# Altium PCB Urukul.PcbDoc (part 9 of 15)
Units mm, origin at the board's own origin, x right, y up, seen from the top; angles counter-clockwise.
Board outline 161.99 x 100 mm, 6 copper layers (L1, L2, L3, L4, P5, L6), stack 1.548 mm thick; 1078 components, 609 nets, 3798 pads, 2552 vias.
Unrouted connection lines stored in the file: 1.
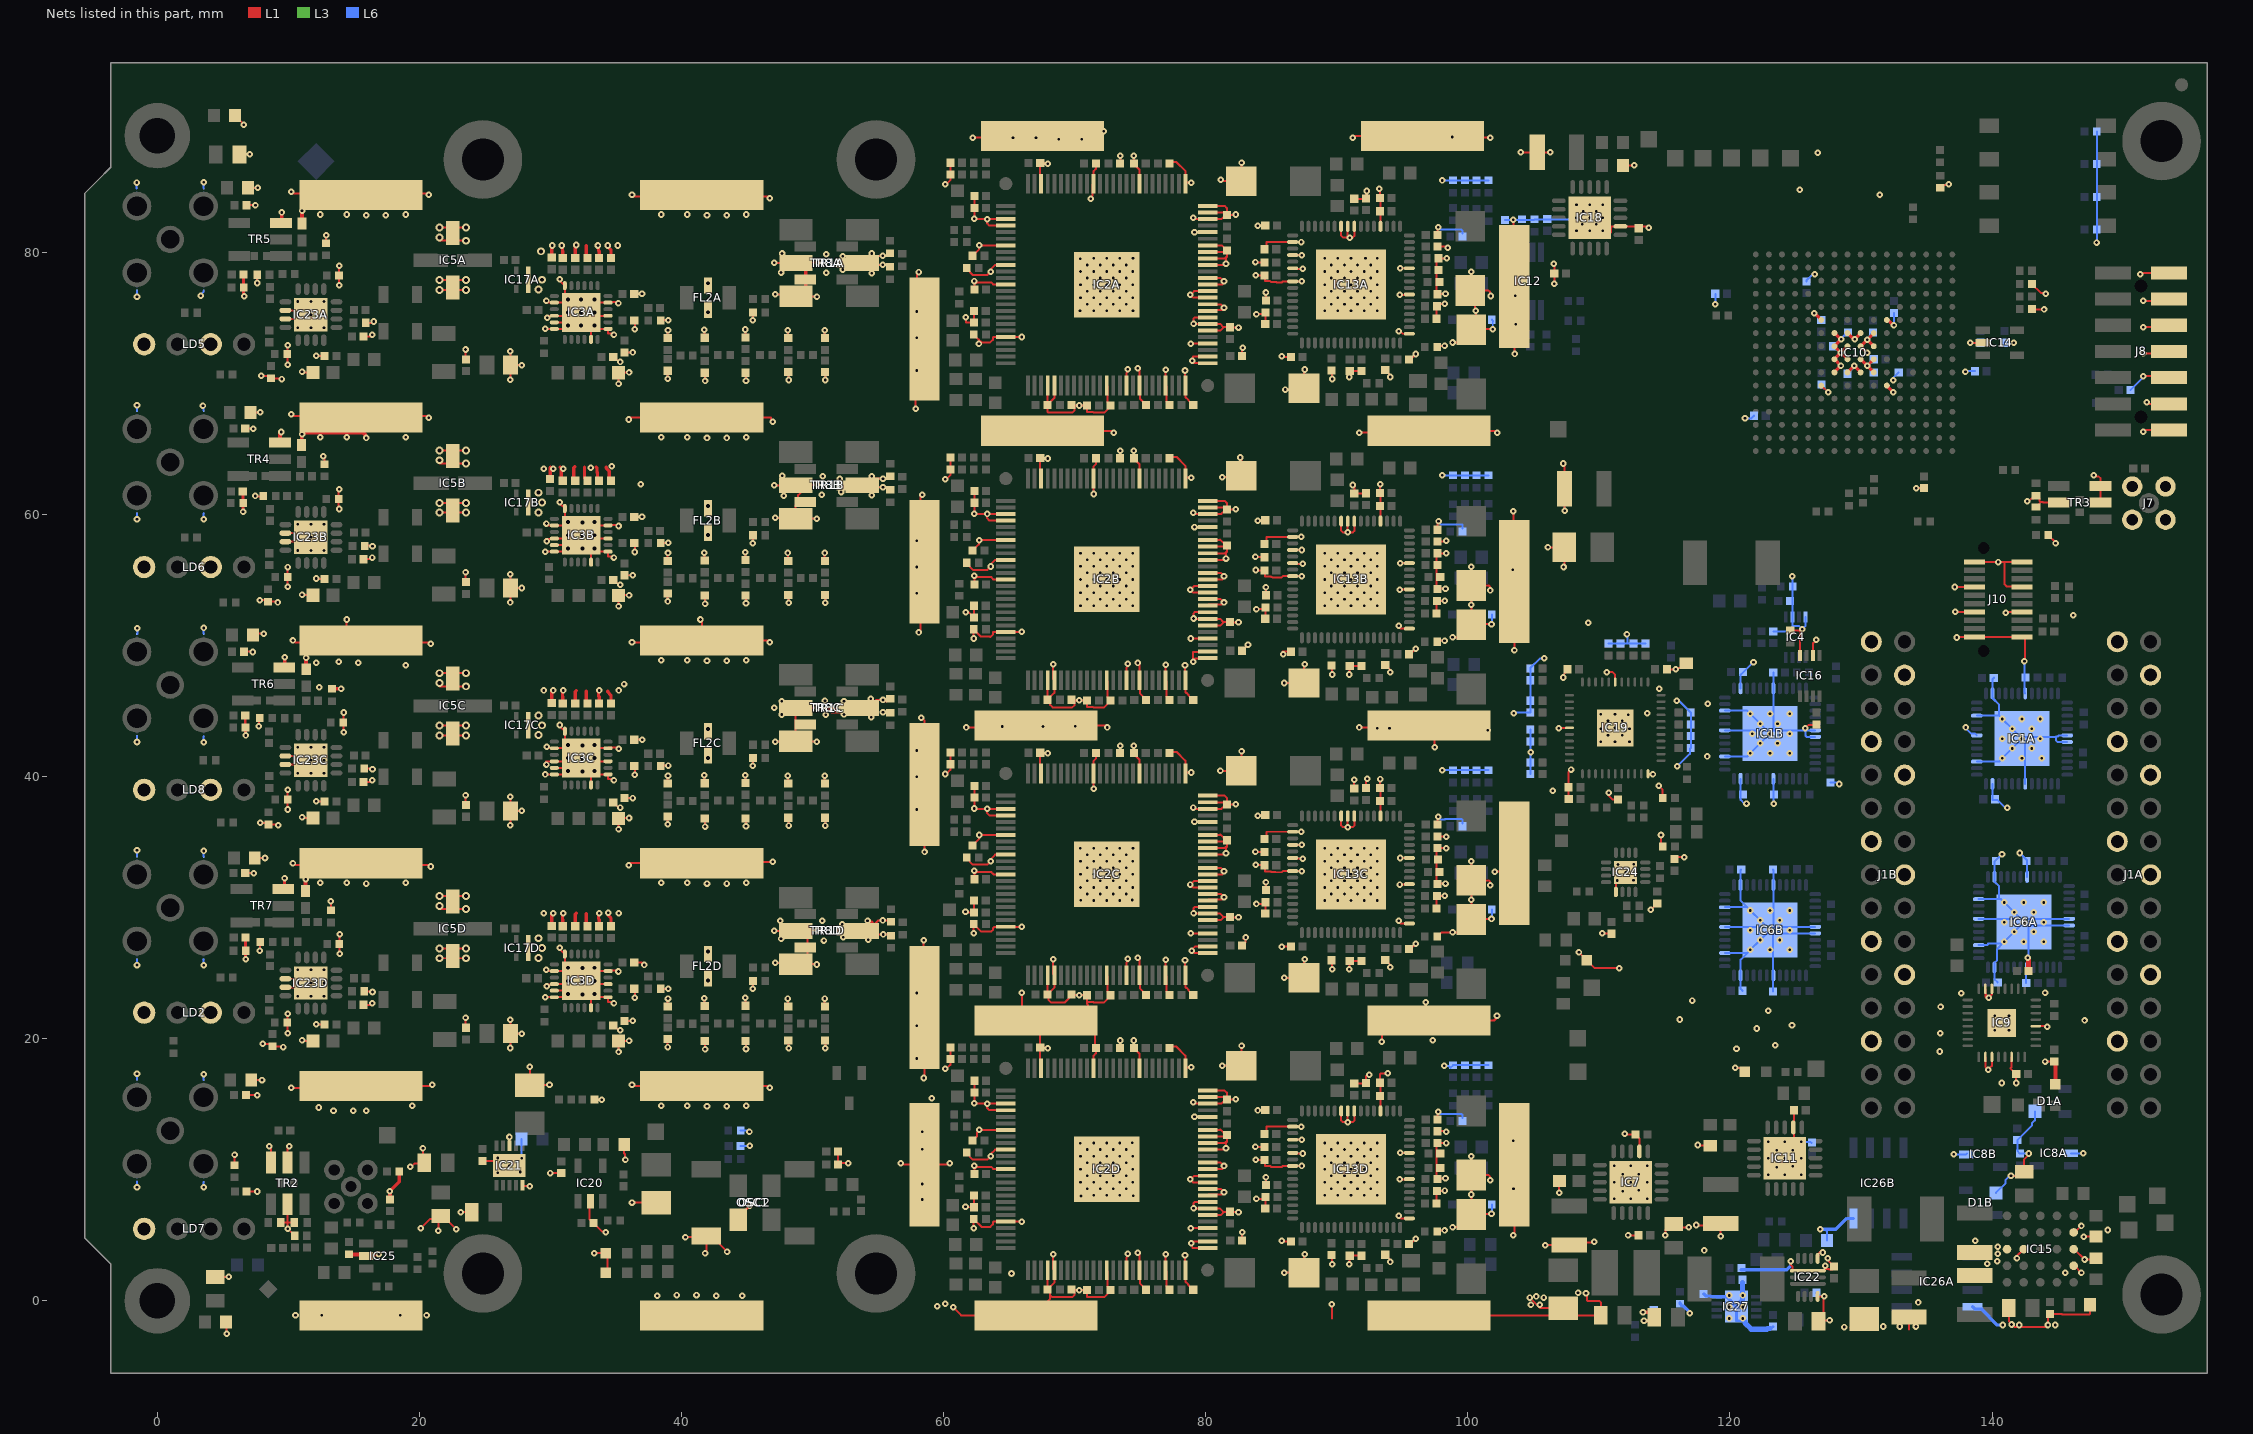
[diagram p11: the nets of this part, all layers, seen from the top]

## Via types
v1: diameter 0.5, hole 0.2, L1 to L6, tented both sides, 1964 vias
v2: diameter 0.5, hole 0.2, L1 to L6, 480 vias
v3: diameter 0.6, hole 0.3, L1 to L6, tented both sides, 52 vias
v4: diameter 0.6, hole 0.3, L1 to L6, 36 vias
v5: diameter 0.762, hole 0.508, L1 to L6, tented both sides, 20 vias

## Nets (pads, with @x,y where several pads share a name; then routed paths per layer and width w, separated by ;. In a path a pad name is that pad's centre, name@x,y a point inside that pad or via, vN(x,y) a via of type N, cw(c..) or ccw(c..) an arc to the next point about the centre after c; other vN are vias at no path point) (continued)
GND: (continued)
  L1 w0.152: C121.2@4.423,1.809 5.45,1.809 v1(5.464,1.823) ; R161.1@5.248,-1.606 5.294,-1.651 v1(5.294,-2.52) ; R6.1@5.894,10.358 v1(5.894,11.138) ; R159.1@5.934,90.444 6.607,89.771 v1(6.607,89.733) ; C113.2@6.263,87.472 6.288,87.498 v1(7.064,87.498) ; C34.1@6.608,49.53 7.275,49.53 7.301,49.505 v1(7.275,49.505) ; C35.2@6.708,32.639 7.325,32.639 v1(7.35,32.614) ; v1@6.708,43.187 v1(6.756,43.138) 6.756,43.71 R74.1@6.728,43.739 ; C31.2@6.708,66.573 7.299,66.573 v1(7.325,66.548) ; R75.1@6.753,26.711 6.759,26.706 v1@6.759,26.138 ; C37.2@6.759,15.697 7.604,15.697 v1(7.629,15.672) ; C11.2@6.796,83.596 v1(7.489,83.596) ; C42.1@6.814,8.338 v1(7.614,8.338) ; R156.1@6.926,84.931 v1(7.65,84.931) v1@7.67,84.931 ; R157.1@7.121,67.787 v1(7.845,67.787) ; R14.1@7.183,16.846 v1(7.987,16.846) ; R158.1@7.291,50.795 7.398,50.902 v1(8.117,50.902) ; R160.1@7.442,33.802 8.203,33.802 v1(8.217,33.788) ; v1(7.463,61.413) 7.488,61.388 8.059,61.388 R3B.1@8.085,61.413 ; v1@7.624,77.753 v1(7.624,77.663) R3A.1@7.624,78.317 ; v1(7.746,43.839) 7.746,44.384 R3C.1@7.819,44.456 ; v1@7.772,16.835 v1@7.783,16.846 ; v1(7.819,26.711) 7.819,27.345 R3D.1@7.855,27.381 ; v1(7.826,53.463) 8.431,53.463 R18B.1@8.451,53.483 ; v1(7.846,36.463) 8.451,36.463 R18C.1@8.471,36.483 ; v1(7.924,70.583) 8.654,70.583 8.729,70.508 R18A.1@8.749,70.528 ; v1(8.035,19.613) 8.765,19.613 8.84,19.538 R18D.1@8.86,19.558 ; R18B.1@8.451,53.343 9.146,53.343 v1(9.201,53.288) ; R18C.1@8.471,36.343 9.166,36.343 v1(9.221,36.288) ; v1(8.555,11.785) 8.674,11.665 TR2.1@8.674,10.553 ; R18A.1@8.749,70.388 9.444,70.388 v1(9.499,70.333) ; R18D.1@8.86,19.418 9.555,19.418 v1(9.61,19.363) ; C69.1@9.434,5.963 9.944,5.963 ; IC23D.11@9.773,23.924 11.398,23.924 v2(11.723,24.249) 11.398,24.574 IC23D.10@9.773,24.574 ; IC23C.11@9.773,40.924 11.398,40.924 v2(11.723,41.249) 11.398,41.574 IC23C.10@9.773,41.574 ; IC23B.11@9.773,57.924 IC23B.17@11.398,57.924 ; IC23B.10@9.773,58.574 11.398,58.574 v2(11.723,58.249) ; IC23A.11@9.773,74.924 11.398,74.924 v2(11.723,75.249) 11.398,75.574 IC23A.10@9.773,75.574 ; TR2.5@9.944,7.373 9.944,5.963 ; TR2.2@9.944,10.553 9.944,11.674 v1(10.055,11.785) ; v1(9.944,20.413) 9.944,21.673 v1(9.944,21.913) ; v1(9.944,37.488) R19C.1@9.944,38.238 9.944,38.748 v1(9.944,38.988) ; v1(9.944,54.488) R19B.1@9.944,55.238 v1(9.944,55.988) ; v1(9.944,71.413) 9.944,72.673 v1(9.944,72.913) ; v1(10.223,16.249) 15.404,16.249 CLIP19.1@15.544,16.388 20.862,16.388 v1(20.973,16.499) ; v1(10.223,67.638) 10.362,67.499 20.612,67.499 v1(20.723,67.388) ; v1(10.223,84.638) 10.362,84.499 20.612,84.499 v1(20.723,84.388) ; v1(10.35,33.388) 10.49,33.249 CLIP16.1@12.444,33.249 ; v1(10.35,50.388) 10.49,50.249 20.74,50.249 v1(20.85,50.138) ; C80.2@10.454,5.963 9.944,5.963 ; R81.1@10.474,4.963 v1(9.944,5.493) 9.944,5.963 ; v1(11.044,19.888) 11.094,19.838 C39D.1@11.894,19.838 ; v1(11.044,36.888) 11.094,36.838 C39C.1@11.894,36.838 ; v1(11.044,53.888) 11.094,53.838 C39B.1@11.894,53.838 ; v1(11.044,70.888) 11.094,70.838 C39A.1@11.894,70.838 ; v1(12.119,21.113) 12.094,21.088 C40D.1@12.769,21.088 ; v1(12.119,38.113) 12.094,38.088 C40C.1@12.769,38.088 ; v1(12.119,55.113) 12.094,55.088 C40B.1@12.769,55.088 ; v1(12.119,72.113) 12.094,72.088 C40A.1@12.769,72.088 ; v1(12.668,64.44) 12.744,64.364 R4B.1@12.744,63.843 ; R4A.1@12.881,80.708 v1(12.881,81.305) ; R4D.1@13.244,29.808 v1(13.244,30.481) ; v1(13.869,60.418) 13.839,60.448 R138B.1@13.839,61.168 13.839,61.888 v1(13.869,61.918) ; v1(13.894,77.478) 13.864,77.508 R138A.1@13.864,78.228 13.864,78.948 v1(13.894,78.978) ; v1(13.923,26.468) 13.893,26.498 R138D.1@13.893,27.218 13.893,27.938 v1(13.923,27.968) ; v1(14.219,43.388) 14.189,43.418 R138C.1@14.189,44.138 14.189,44.858 v1(14.219,44.888) ; v1(14.444,51.988) 14.444,51.488 CLIP24.1@15.544,50.388 ; C38D.2@15.744,22.588 v1@16.293,22.588 ; C38C.2@15.744,39.588 v1@16.293,39.588 ; C38B.2@15.744,56.588 v1@16.293,56.588 ; C38A.2@15.744,73.588 v1@16.293,73.588 ; R20D.1@15.793,23.619 16.363,23.619 v1(16.419,23.563) ; R20C.1@15.793,40.619 16.363,40.619 v1(16.419,40.563) ; R20B.1@15.793,57.619 16.363,57.619 v1(16.419,57.563) ; R20A.1@15.793,74.619 16.402,74.619 v1(16.51,74.727) ; CLIP16.1@18.944,33.249 20.74,33.249 v1(20.85,33.138) ; v1(19.299,10.243) 19.393,10.243 19.638,10.488 20.319,10.488 C215.1@20.369,10.538 20.269,10.638 v1(20.269,11.638) ; v1(20.091,5.537) 20.792,6.238 21.044,6.238 C155.1@21.444,6.638 ; v1(21.438,5.334) 21.444,5.34 C155.1@21.444,6.638 ; v3(21.544,26.138) v3(23.544,26.138) ; v3(21.544,26.888) v3(23.544,26.888) ; v3@21.544,29.888 v3(23.544,29.888) ; v3(21.544,30.888) v3(23.544,30.888) ; v3(21.544,43.138) v3(23.544,43.138) ; v3(21.544,43.888) v3(23.544,43.888) ; v3@21.544,46.888 v3(23.544,46.888) ; v3(21.544,47.888) v3(23.544,47.888) ; v3(21.544,60.138) v3(23.544,60.138) ; v3(21.544,60.888) v3(23.544,60.888) ; v3@21.544,63.888 v3(23.544,63.888) ; v3(21.544,64.888) v3(23.544,64.888) ; v3(21.544,77.138) v3(23.544,77.138) ; v3(21.544,77.888) v3(23.544,77.888) ; v3@21.544,80.888 v3(23.544,80.888) ; v3(21.544,81.888) v3(23.544,81.888) ; v1(22.809,5.461) 21.632,6.638 C155.1@21.444,6.638 ; v1(23.152,6.762) v1(23.152,6.762) C132.1@24.444,6.763 ; v1(23.519,21.588) 23.519,20.863 C27D.1@23.544,20.838 ; v1(23.519,38.588) 23.519,37.863 C27C.1@23.544,37.838 ; v1(23.519,55.588) 23.519,54.863 C27B.1@23.544,54.838 ; v1(23.519,72.588) 23.519,71.863 C27A.1@23.544,71.838 ; C177.1@24.817,10.68 26.504,10.68 v2(26.869,10.315) ; IC21.8@26.869,11.815 v1(26.869,12.499) ; v1(26.919,19.288) 27.019,19.388 26.944,19.463 C12D.1@26.944,20.388 ; v1(26.919,36.288) 27.019,36.388 26.944,36.463 C12C.1@26.944,37.388 ; v1(26.919,53.288) 27.019,53.388 26.944,53.463 C12B.1@26.944,54.388 ; v1(26.919,70.288) 27.019,70.388 26.944,70.463 C12A.1@26.944,71.388 ; v1(26.932,21.451) 26.869,21.388 26.944,21.313 C12D.1@26.944,20.388 ; v1(26.932,38.451) 26.869,38.388 26.944,38.313 C12C.1@26.944,37.388 ; v1(26.932,55.451) 26.869,55.388 26.944,55.313 C12B.1@26.944,54.388 ; v1(26.932,72.451) 26.869,72.388 26.944,72.313 C12A.1@26.944,71.388 ; v1(27.794,20.388) C12D.1@26.944,20.388 ; v1(27.794,37.388) C12C.1@26.944,37.388 ; v1(27.794,54.388) C12B.1@26.944,54.388 ; v1(27.794,71.388) C12A.1@26.944,71.388 ; IC21.5@27.869,8.815 27.935,8.749 v1(28.424,8.749) ; v1(28.428,17.851) 28.424,17.847 C174.2@28.424,16.452 29.877,16.452 v1(29.924,16.499) ; v1@29.554,24.053 v1@29.569,24.038 ; v1@29.566,25.222 29.625,25.163 IC3D.14@30.294,25.163 30.856,25.163 ; v1(29.594,23.163) IC3D.18@30.294,23.163 31.094,23.163 v4(31.344,23.413) IC3D.25@31.594,23.663 ; v1(29.594,40.163) IC3C.18@30.294,40.163 31.094,40.163 v4(31.344,40.413) IC3C.25@31.594,40.663 ; v1(29.594,57.163) IC3B.18@30.294,57.163 31.094,57.163 v4(31.344,57.413) IC3B.25@31.594,57.663 ; v1(29.594,74.163) IC3A.18@30.294,74.163 31.094,74.163 v4(31.344,74.413) IC3A.25@31.594,74.663 ; v1@29.598,41.009 29.688,40.919 v1(29.693,40.919) 29.693,41.06 29.642,41.111 29.669,41.138 30.269,41.138 IC3C.16@30.294,41.163 IC3C.25@32.094,41.163 ; v1(29.693,59.309) 29.838,59.163 IC3B.14@30.294,59.163 30.856,59.163 ; v1(29.693,76.302) 29.831,76.163 IC3A.14@30.294,76.163 30.856,76.163 ; v1(29.718,24.003) 29.604,24.003 v1@29.569,24.038 ; v1(29.718,42.266) 29.711,42.266 29.791,42.345 29.845,42.291 29.845,42.163 IC3C.14@30.294,42.163 30.856,42.163 ; v1(29.718,57.963) 29.653,57.963 29.603,58.014 29.598,58.009 29.569,58.038 29.669,58.138 30.269,58.138 IC3B.16@30.294,58.163 IC3B.25@32.094,58.163 ; v1(29.743,75.006) 29.697,75.006 29.646,75.057 29.598,75.009 29.569,75.038 29.669,75.138 30.269,75.138 IC3A.16@30.294,75.163 IC3A.25@32.094,75.163 ; v1(29.973,9.749) 29.983,9.738 C173.1@30.824,9.738 ; IC3D.17@30.294,23.663 IC3D.25@31.594,23.663 ; IC3C.17@30.294,40.663 IC3C.25@31.594,40.663 ; IC3B.17@30.294,57.663 IC3B.25@31.594,57.663 ; IC3A.17@30.294,74.663 IC3A.25@31.594,74.663 ; v1(30.719,26.938) 30.719,26.838 IC3D.12@31.094,26.463 31.094,25.663 v4(31.344,25.413) IC3D.25@32.344,24.413 IC3D.25@32.369,24.388 ; v1(30.719,43.938) 30.719,43.838 IC3C.12@31.094,43.463 31.094,42.663 v4(31.344,42.413) IC3C.25@32.344,41.413 IC3C.25@32.369,41.388 ; v1(30.719,60.938) 30.719,60.838 IC3B.12@31.094,60.463 31.094,59.663 v4(31.344,59.413) IC3B.25@32.344,58.413 IC3B.25@32.369,58.388 ; v1(30.719,77.938) 30.719,77.838 IC3A.12@31.094,77.463 31.094,76.663 v4(31.344,76.413) v4(32.344,75.413) ; IC20.2@33.044,7.61 32.973,7.538 32.973,6.24 33.914,5.298 34.152,5.298 v1(34.219,5.232) ; IC3D.23@33.094,22.363 33.094,23.663 32.444,24.313 v4(32.444,24.388) ; IC3C.23@33.094,39.363 33.094,40.663 32.444,41.313 v4(32.444,41.388) ; IC3B.23@33.094,56.363 33.094,57.663 32.444,58.313 v4(32.444,58.388) ; IC3A.23@33.094,73.363 33.094,74.663 v4(32.344,75.413) ; v1(33.344,3.638) LD9.1@34.219,3.638 ; R135.1@33.36,15.348 v1(33.925,15.348) ; 33.832,23.163 IC3D.1@34.394,23.163 34.394,22.801 34.756,22.801 v1(34.844,22.713) ; 33.832,24.163 IC3D.3@34.394,24.163 ; 33.832,40.163 IC3C.1@34.394,40.163 34.394,39.801 34.756,39.801 v1(34.844,39.713) ; 33.832,41.163 IC3C.3@34.394,41.163 ; 33.832,57.163 IC3B.1@34.394,57.163 34.394,56.801 34.756,56.801 v1(34.844,56.713) ; 33.832,58.163 IC3B.3@34.394,58.163 ; 33.832,74.163 IC3A.1@34.394,74.163 34.394,73.801 34.756,73.801 v1(34.844,73.713) ; 33.832,75.163 IC3A.3@34.394,75.163 ; LD9.1@34.284,3.703 34.349,3.638 LD1.1@34.349,2.243 ; C23D.1@34.794,21.013 34.819,21.013 v1@35.194,20.638 ; C23C.1@34.794,38.013 34.819,38.013 v1@35.194,37.638 ; C23B.1@34.794,55.013 34.819,55.013 v1@35.194,54.638 ; C23A.1@34.794,72.013 34.819,72.013 v1@35.194,71.638 ; v1(35.187,25.126) 35.098,25.038 35.077,25.038 35.148,25.109 35.044,25.213 34.444,25.213 IC3D.5@34.394,25.163 33.094,25.163 32.444,24.513 v4(32.444,24.388) ; v1(35.187,76.126) 35.166,76.126 35.148,76.109 35.044,76.213 34.444,76.213 IC3A.5@34.394,76.163 33.094,76.163 v4(32.344,75.413) ; v1(35.193,59.12) 35.193,59.125 35.179,59.139 35.148,59.109 35.044,59.213 34.444,59.213 IC3B.5@34.394,59.163 33.094,59.163 32.444,58.513 v4(32.444,58.388) ; v1(35.194,18.988) C21D.1@35.194,19.813 35.219,19.838 v1(35.994,19.838) ; v1(35.194,35.988) C21C.1@35.194,36.813 35.219,36.838 v1(35.994,36.838) ; v1(35.194,52.988) C21B.1@35.194,53.813 35.219,53.838 v1(35.994,53.838) ; v1(35.194,69.988) C21A.1@35.194,70.813 35.219,70.838 v1(35.994,70.838) ; v1(35.204,42.113) 35.179,42.113 35.166,42.126 35.148,42.109 35.044,42.213 34.444,42.213 IC3C.5@34.394,42.163 33.094,42.163 32.444,41.513 v4(32.444,41.388) ; v1@35.245,20.587 v1@35.194,20.638 ; v1@35.245,37.587 v1@35.194,37.638 ; v1@35.245,54.587 v1@35.194,54.638 ; v1@35.245,71.587 v1@35.194,71.638 ; v1(35.319,20.638) v1@35.194,20.638 ; v1(35.319,37.638) v1@35.194,37.638 ; v1(35.319,54.638) v1@35.194,54.638 ; v1(35.319,71.638) v1@35.194,71.638 ; R132.1@35.624,11.938 35.624,11.238 35.674,11.188 35.674,10.797 v1(35.723,10.749) ; C22D.1@35.644,21.363 v1(36.269,21.363) ; C22C.1@35.644,38.363 v1(36.269,38.363) ; C22B.1@35.644,55.363 v1(36.269,55.363) ; C22A.1@35.644,72.363 v1(36.269,72.363) ; v1(35.973,33.249) 36.112,33.388 CLIP17.1@41.544,33.388 41.654,33.499 v1(46.973,33.499) ; v1(35.973,67.249) 36.112,67.388 CLIP22.1@41.544,67.388 46.833,67.388 46.833,67.215 v1(46.973,67.076) ; v1(36.223,7.499) 36.233,7.488 C79.2@38.074,7.488 ; v1(36.223,16.499) 36.333,16.388 CLIP8.1@41.544,16.388 46.583,16.388 v1(46.723,16.249) ; v1(36.223,50.249) CLIP25.1@41.404,50.249 ; v1(36.223,84.388) 36.362,84.249 46.612,84.249 v1(46.723,84.138) ; C24D.1@36.394,23.813 36.444,23.763 v1(36.444,23.138) ; C14D.1@36.394,25.813 36.976,25.813 v1(37.162,25.627) ; C24C.1@36.394,40.813 36.444,40.763 v1(36.444,40.138) ; C14C.1@36.394,42.813 36.997,42.813 v1(37.008,42.824) ; C24B.1@36.394,57.813 36.444,57.763 v1(36.444,57.138) ; C14B.1@36.394,59.813 36.979,59.813 v1(36.982,59.817) ; C24A.1@36.394,74.813 36.444,74.763 v1(36.444,74.138) ; C14A.1@36.394,76.813 36.961,76.813 v1(36.982,76.835) ; R58D.2@38.414,23.813 38.427,23.8 v1(38.989,23.8) ; R58C.2@38.414,40.813 38.444,40.843 v1(38.989,40.843) ; R58B.2@38.414,57.813 38.437,57.836 v1(38.989,57.836) ; R58A.2@38.414,74.813 38.429,74.828 v1(38.989,74.828) ; v1(38.944,19.363) C202D.2@38.944,19.963 ; C207D.1@38.944,22.463 38.944,23.038 v1(38.969,23.063) ; v1(38.944,36.363) C202C.2@38.944,36.963 ; C207C.1@38.944,39.463 38.944,40.038 v1(38.969,40.063) ; v1(38.944,53.363) C202B.2@38.944,53.963 ; C207B.1@38.944,56.463 38.944,57.038 v1(38.969,57.063) ; v1(38.944,70.363) C202A.2@38.944,70.963 ; C207A.1@38.944,73.463 38.944,74.038 v1(38.969,74.063) ; v1(40.301,4.857) 41.797,4.857 OSC1.2@41.889,4.948 ; v1(41.444,51.988) 41.544,51.888 CLIP25.1@41.544,50.388 46.583,50.388 v1(46.723,50.249) ; v1(41.744,23.088) 41.744,22.513 C180D.2@41.769,22.488 ; v1(41.744,40.088) 41.744,39.513 C180C.2@41.769,39.488 ; v1(41.744,57.088) 41.744,56.513 C180B.2@41.769,56.488 ; v1(41.744,74.088) 41.744,73.513 C180A.2@41.769,73.488 ; C206D.1@41.769,19.813 41.794,19.788 v1(41.794,19.188) ; C206C.1@41.769,36.813 41.794,36.788 v1(41.794,36.188) ; C206B.1@41.769,53.813 41.794,53.788 v1(41.794,53.188) ; C206A.1@41.769,70.813 41.794,70.788 v1(41.794,70.188) ; v1(41.794,3.638) 41.889,3.733 OSC1.2@41.889,4.948 ; v1@43.373,3.848 42.273,4.948 OSC1.2@41.889,4.948 ; OSC2.2@44.321,6.188 44.92,6.787 44.92,6.965 v1(45.191,7.236) ; C205D.1@44.869,22.538 v1(44.869,23.113) ; C205C.1@44.869,39.538 v1(44.869,40.113) ; C205B.1@44.869,56.538 v1(44.869,57.113) ; C205A.1@44.869,73.538 v1(44.869,74.113) ; v1(44.919,19.213) C176D.2@44.919,19.788 ; v1(44.919,36.213) C176C.2@44.919,36.788 ; v1(44.919,53.213) C176B.2@44.919,53.788 ; v1(44.919,70.213) C176A.2@44.919,70.788 ; v1(45.441,23.825) 45.45,23.835 R57D.2@45.45,24.415 ; v1(45.441,40.818) 45.45,40.827 R57C.2@45.45,41.415 ; v1(45.441,57.81) 45.45,57.82 R57B.2@45.45,58.415 ; v1(45.441,74.828) 45.45,74.838 R57A.2@45.45,75.415 ; v1(47.069,28.238) 47.082,28.225 TR1D.2@48.714,28.225 48.752,28.263 TR1D.2@49.594,28.263 ; v1(47.069,62.238) 47.082,62.225 TR1B.2@48.714,62.225 48.752,62.263 v1(50.369,62.263) ; v1(47.084,79.201) 47.097,79.188 TR1A.2@48.729,79.188 48.767,79.226 v1(50.384,79.226) ; v1(47.142,42.672) 48.633,42.672 48.667,42.638 TR1C.3@48.714,42.685 ; v1(47.142,59.741) 48.564,59.741 48.667,59.638 TR1B.3@48.714,59.685 ; v1(47.146,25.79) 48.515,25.79 48.667,25.638 TR1D.3@48.714,25.685 50.297,25.685 v1(50.319,25.663) ; v1(47.157,76.798) 48.485,76.798 48.682,76.601 TR1A.3@48.729,76.648 50.312,76.648 v1(50.334,76.626) ; C172D.2@48.119,22.488 v1(48.119,23.063) ; C172C.2@48.119,39.488 v1(48.119,40.063) ; C172B.2@48.119,56.488 v1(48.119,57.063) ; C172A.2@48.119,73.488 v1(48.119,74.063) ; v1(48.169,19.263) C204D.1@48.169,19.838 ; v1(48.169,36.263) C204C.1@48.169,36.838 ; v1(48.169,53.263) C204B.1@48.169,53.838 ; v1(48.169,70.263) C204A.1@48.169,70.838 ; TR1C.2@48.714,45.225 TR1C.2@48.819,45.225 ; TR1C.2@48.819,45.263 TR1C.2@49.187,45.263 ; TR1C.2@49.187,45.211 48.714,44.738 TR8C.4@48.714,43.968 ; TR1C.2@49.187,45.225 v1@50.369,45.225 ; TR1B.2@49.294,61.888 48.89,61.484 48.89,60.886 48.714,60.71 TR1B.3@48.714,59.685 ; TR8C.4@49.454,43.968 TR8C.4@48.714,43.968 ; TR1D.2@49.594,28.338 TR1D.2@49.594,28.263 ; TR1D.3@49.619,26.163 49.619,26.808 TR8D.4@49.454,26.973 49.594,27.113 TR1D.2@49.594,28.263 ; v1(50.319,42.663) 50.297,42.685 TR1C.3@48.714,42.685 ; v1(50.319,59.663) 50.297,59.685 TR1B.3@48.714,59.685 ; v1(50.369,28.263) TR1D.2@49.594,28.263 ; v1(50.369,45.263) v1@50.369,45.225 ; C203D.1@50.919,22.488 v1(50.919,23.063) ; C203C.1@50.919,39.488 v1(50.919,40.063) ; C203B.1@50.919,56.488 v1(50.919,57.063) ; C203A.1@50.919,73.488 v1(50.919,74.063) ; v1(50.969,19.263) C164D.2@50.969,19.838 ; v1(50.969,36.263) C164C.2@50.969,36.838 ; v1(50.969,53.263) C164B.2@50.969,53.838 ; v1(50.969,70.263) C164A.2@50.969,70.838 ; C101.1@51.944,11.388 C102.1@51.944,10.388 52.055,10.499 v1(52.723,10.499) ; v1(52.397,44.741) 52.397,44.907 51.46,44.907 ; TR1C.5@54.136,44.907 51.46,44.907 ; TR1C.5@54.16,44.907 54.136,44.883 TR1C.5@53.794,45.225 v1@54.512,45.943 ; v1(54.444,45.938) 54.507,45.938 v1@54.512,45.943 ; v1(55.372,44.907) 55.82,44.907 55.844,44.883 55.917,44.883 R38C.2@55.931,44.869 ; R54C.2@55.844,45.943 55.621,45.72 55.494,45.847 v1(55.372,45.847) 54.862,45.847 TR1C.5@54.735,45.72 ; R38B.2@55.844,61.883 55.65,62.078 v1(55.372,62.078) 54.33,62.078 54.136,61.883 TR1B.5@53.794,62.225 54.512,62.943 54.717,62.738 v1(55.372,62.738) 55.639,62.738 R54B.2@55.844,62.943 ; R38A.2@55.844,78.883 55.668,79.059 55.655,79.045 53.952,79.045 TR1A.5@53.809,79.188 54.182,79.188 54.725,79.731 v1(55.347,79.731) 55.631,79.731 R54A.2@55.844,79.943 ; R54D.2@55.855,28.932 55.766,29.021 v1(55.36,29.021) 55,29.021 54.717,28.738 54.512,28.943 TR1D.5@53.794,28.225 54.218,27.802 54.37,27.954 v1(55.385,27.954) 55.773,27.954 55.844,27.883 55.951,27.883 R38D.2@55.969,27.865 ; v1(56.723,10.499) 56.833,10.388 CLIP2.1@58.544,10.388 60.362,10.388 v1(60.473,10.499) ; v1(57.862,68.08) 57.862,70.878 57.973,70.988 57.973,78.359 v1(58.112,78.499) ; v1(58.112,50.999) 58.223,51.109 58.223,61.359 v1(58.362,61.499) ; v1(58.294,44.499) 58.544,44.249 CLIP26.1@58.544,39.388 v1(58.544,34.249) ; v1(58.473,16.999) 58.544,17.07 CLIP18.1@58.544,22.388 58.544,26.499 58.473,26.57 v1(58.473,27.499) 58.473,27.606 58.544,27.677 v1@58.544,27.499 ; v1(60.125,17.696) 60.202,17.696 60.514,18.008 C87D.1@60.514,18.438 C26D.1@60.514,19.338 ; v1(60.125,40.196) 60.202,40.196 60.514,40.508 C87C.1@60.514,40.938 C26C.1@60.514,41.838 ; v1(60.125,62.696) 60.202,62.696 60.514,63.008 C87B.1@60.514,63.438 C26B.1@60.514,64.338 ; v1(60.125,85.196) 60.202,85.196 60.514,85.508 C87A.1@60.514,85.938 C26A.1@60.514,86.838 ; v1(60.723,-0.501) 61.333,-1.112 CLIP20.1@67.044,-1.112 67.044,-0.912 68.119,0.163 68.119,0.437 ; v1(61.669,7.188) 61.719,7.138 C116D.1@62.314,7.138 C118D.1@62.314,8.038 ; v1(61.669,29.688) 61.719,29.638 C116C.1@62.314,29.638 C118C.1@62.314,30.538 ; v1(61.694,52.541) 61.814,52.541 61.863,52.59 C116B.1@62.314,52.138 C118B.1@62.314,53.038 ; v1(61.694,75.041) 61.694,74.663 61.719,74.638 C116A.1@62.314,74.638 C118A.1@62.314,75.538 ; v1(61.723,43.749) 66.904,43.749 CLIP11.1@67.044,43.888 72.333,43.888 v1(72.473,43.749) ; R112D.2@61.749,11.313 61.749,11.258 62.232,10.775 63.337,10.775 v1(63.592,11.03) 63.592,11.114 63.544,11.162 63.923,11.541 IC2D.85@64.744,11.541 ; R112C.2@61.749,33.813 61.749,33.758 62.232,33.275 63.337,33.275 v1(63.592,33.53) 63.592,33.614 63.544,33.662 63.923,34.041 IC2C.85@64.744,34.041 ; R112B.2@61.749,56.313 61.749,56.258 62.232,55.775 63.337,55.775 v1(63.592,56.03) 63.592,56.114 63.544,56.162 63.923,56.541 IC2B.85@64.744,56.541 ; R112A.2@61.749,78.813 61.749,78.758 62.232,78.275 63.337,78.275 v1(63.592,78.53) 63.592,78.614 63.544,78.662 63.923,79.041 IC2A.85@64.744,79.041 ; C124D.1@62.214,12.238 62.544,12.568 62.544,12.863 v1(62.722,13.041) IC2D.82@64.744,13.041 ; C124C.1@62.214,34.738 62.214,34.745 62.687,35.218 62.687,35.506 v1(62.722,35.541) IC2C.82@64.744,35.541 ; C124B.1@62.214,57.238 62.214,57.245 62.687,57.718 62.687,58.006 v1(62.722,58.041) IC2B.82@64.744,58.041 ; C124A.1@62.214,79.738 62.214,79.745 62.713,80.244 62.713,80.532 v1(62.722,80.541) IC2A.82@64.744,80.541 ; v1(62.223,88.749) v1(65.294,88.749) v1(67.044,88.749) 67.404,88.749 67.899,89.244 v1(72.228,89.244) ; v1(62.294,5.538) R88D.1@62.294,6.238 62.889,5.643 63.569,5.643 63.752,5.826 63.752,5.999 63.794,6.041 IC2D.96@64.744,6.041 v1(65.966,6.041) ; v1(62.294,28.038) R88C.1@62.294,28.738 62.844,28.188 63.647,28.188 63.779,28.321 63.779,28.448 63.872,28.541 IC2C.96@64.744,28.541 v1(65.966,28.541) ; v1(62.294,50.538) R88B.1@62.294,51.238 62.844,50.688 63.524,50.688 63.569,50.643 63.752,50.826 63.752,50.999 63.794,51.041 IC2B.96@64.744,51.041 v1(65.966,51.041) ; R88A.1@62.294,73.738 62.694,73.338 ; C117D.1@62.344,9.663 v1@62.344,10.173 ; v1(62.344,10.313) v1@62.344,10.173 ; C158D.1@62.344,16.791 C157D.1@62.344,15.891 v1(62.344,15.063) 62.366,15.041 v1(63.319,15.041) ; C117C.1@62.344,32.163 v1@62.344,32.673 ; v1(62.344,32.813) v1@62.344,32.673 ; C158C.1@62.344,39.291 C157C.1@62.344,38.391 v1(62.344,37.563) 62.366,37.541 v1(63.319,37.541) ; C117B.1@62.344,54.663 v1@62.344,55.173 ; v1(62.344,55.313) v1@62.344,55.173 ; C158B.1@62.344,61.791 C157B.1@62.344,60.891 v1(62.344,60.063) 62.366,60.041 v1(63.319,60.041) ; C117A.1@62.344,77.163 v1@62.344,77.673 ; v1(62.344,77.813) v1@62.344,77.673 ; C158A.1@62.344,84.291 C157A.1@62.344,83.391 v1(62.344,82.563) 62.366,82.541 v1(63.319,82.541) ; v1(62.694,73.041) 62.694,73.338 ; IC2D.88@64.744,10.041 63.794,10.041 63.782,10.053 63.782,10.068 63.636,10.213 62.544,10.213 62.504,10.173 v1@62.344,10.173 ; IC2D.79@64.744,14.541 63.491,14.541 63.319,14.713 v1(63.319,15.041) ; IC2D.78@64.744,15.041 v1(63.319,15.041) ; IC2C.88@64.744,32.541 63.794,32.541 63.782,32.553 63.782,32.568 63.636,32.713 62.544,32.713 62.504,32.673 v1@62.344,32.673 ; IC2C.79@64.744,37.041 63.491,37.041 63.319,37.213 v1(63.319,37.541) ; IC2C.78@64.744,37.541 v1(63.319,37.541) ; IC2B.88@64.744,55.041 63.794,55.041 63.782,55.053 63.782,55.068 63.636,55.213 62.544,55.213 62.504,55.173 v1@62.344,55.173 ; IC2B.79@64.744,59.541 63.491,59.541 63.319,59.713 v1(63.319,60.041) ; IC2B.78@64.744,60.041 v1(63.319,60.041) ; IC2A.88@64.744,77.541 63.794,77.541 63.782,77.553 63.782,77.568 63.636,77.713 62.544,77.713 62.504,77.673 v1@62.344,77.673 ; IC2A.79@64.744,82.041 63.491,82.041 63.319,82.213 v1(63.319,82.541) ; IC2A.78@64.744,82.541 v1(63.319,82.541) ; v1(65.966,73.541) IC2A.96@64.744,73.541 63.794,73.541 63.752,73.499 63.752,73.326 63.553,73.127 62.906,73.127 62.694,73.338 ; v1(65.973,23.499) 65.973,22.46 CLIP14.1@67.044,21.388 ; IC2D.73@67.444,17.741 67.369,17.816 C159D.1@67.369,19.316 ; IC2C.73@67.444,40.241 67.369,40.316 C159C.1@67.369,41.816 67.991,41.816 67.95,41.774 v1(67.95,41.771) ; IC2B.73@67.444,62.741 67.369,62.816 C159B.1@67.369,64.316 67.991,64.316 67.95,64.274 v1(67.95,64.271) ; IC2A.73@67.444,85.241 67.369,85.316 C159A.1@67.369,86.816 67.991,86.816 67.95,86.774 v1(67.95,86.771) ; CLIP15.1@67.544,66.388 72.833,66.388 v1(72.973,66.249) ; C120C.1@67.919,23.363 C120C.1@67.995,23.439 ; C120B.1@67.919,45.863 C120B.1@67.995,45.939 ; IC2D.4@67.944,2.341 67.944,0.991 C120D.1@67.995,0.939 ; IC2C.4@67.944,24.841 67.944,23.491 C120C.1@67.995,23.439 ; IC2B.4@67.944,47.341 67.944,45.991 C120B.1@67.995,45.939 ; IC2A.4@67.944,69.841 67.944,68.491 C120A.1@67.995,68.439 ; v1(67.95,19.271) 67.95,19.274 67.991,19.316 C159D.1@67.369,19.316 ; v1(68.351,3.555) 68.351,2.434 IC2D.5@68.444,2.341 68.444,1.388 C120D.1@67.995,0.939 ; v1(68.351,26.059) 68.351,24.934 IC2C.5@68.444,24.841 68.444,23.888 C120C.1@67.995,23.439 ; v1(68.351,48.564) 68.351,47.434 IC2B.5@68.444,47.341 68.444,46.388 C120B.1@67.995,45.939 ; IC2A.5@68.444,69.841 68.444,68.888 C120A.1@67.995,68.439 ; v1(71.22,84.091) 71.22,84.185 71.37,84.335 71.37,85.167 IC2A.65@71.444,85.241 71.444,86.201 71.619,86.376 C108A.1@71.619,86.788 ; IC2D.65@71.444,17.741 71.444,18.714 71.619,18.889 C108D.1@71.619,19.288 71.543,19.365 71.543,20.503 70.657,21.388 CLIP14.1@69.862,21.388 ; v1(71.444,39.063) IC2C.65@71.444,40.241 71.444,41.193 71.619,41.368 C108C.1@71.619,41.788 ; v1(71.444,61.563) IC2B.65@71.444,62.741 71.444,63.672 71.619,63.847 C108B.1@71.619,64.288 ; IC2D.13@72.444,2.341 72.494,2.291 72.494,1.066 C110D.1@72.744,0.816 72.744,0.773 72.248,0.278 71.44,0.278 71.412,0.306 70.944,0.306 C109D.1@70.944,0.816 v1(70.344,0.816) 69.994,0.816 69.994,0.449 69.823,0.278 68.279,0.278 68.119,0.437 ; IC2C.13@72.444,24.841 72.494,24.791 72.494,23.566 C110C.1@72.744,23.316 72.744,23.273 72.248,22.778 71.44,22.778 71.412,22.806 70.944,22.806 ; IC2B.13@72.444,47.341 72.494,47.291 72.494,46.066 C110B.1@72.744,45.816 72.744,45.773 72.248,45.278 71.44,45.278 71.412,45.306 70.944,45.306 C109B.1@70.944,45.816 v1(70.344,45.816) 69.994,45.816 69.994,45.458 69.814,45.278 68.313,45.278 68.119,45.472 68.119,45.816 C120B.1@67.995,45.939 ; IC2A.13@72.444,69.841 72.494,69.791 72.494,68.566 C110A.1@72.744,68.316 72.744,68.273 72.248,67.778 71.44,67.778 71.412,67.806 70.944,67.806 C109A.1@70.944,68.316 v1(70.344,68.316) 69.994,68.316 69.994,67.962 69.81,67.778 67.994,67.778 67.919,67.853 C120A.1@67.919,68.363 C120A.1@67.995,68.439 ; C43D.1@73.469,19.288 v1(73.469,19.863) ; C43C.1@73.469,41.788 v1(73.469,42.363) ; C43B.1@73.469,64.288 v1(73.469,64.863) ; C43A.1@73.469,86.788 73.486,86.805 v1(73.486,87.363) ; IC2D.16@73.944,2.341 73.944,3.291 74.05,3.397 v1(74.05,3.596) ; IC2C.16@73.944,24.841 73.944,25.791 74.05,25.897 v1(74.05,26.096) ; IC2B.16@73.944,47.341 73.944,48.291 74.05,48.397 v1(74.05,48.596) ; IC2A.16@73.944,69.841 73.944,70.791 74.05,70.897 v1(74.05,71.096) ; v1(74.519,19.863) C51D.1@74.519,19.288 74.906,18.901 74.906,18.894 74.944,18.856 IC2D.58@74.944,17.741 ; v1(74.519,42.363) C51C.1@74.519,41.788 74.442,41.788 74.944,41.286 IC2C.58@74.944,40.241 ; v1(74.519,64.863) C51B.1@74.519,64.288 74.472,64.288 74.944,63.816 IC2B.58@74.944,62.741 ; v1(74.519,87.363) C51A.1@74.519,86.788 74.476,86.788 74.944,86.321 IC2A.58@74.944,85.241 ; v1(74.8,3.671) 74.837,3.671 74.944,3.563 IC2D.18@74.944,2.341 74.979,2.306 74.979,1.348 75.444,0.883 C83D.1@75.444,0.841 ; v1(74.8,26.171) 74.837,26.171 74.944,26.063 IC2C.18@74.944,24.841 74.979,24.806 74.979,23.848 75.444,23.383 C83C.1@75.444,23.341 ; v1(74.8,48.671) 74.837,48.671 74.944,48.563 IC2B.18@74.944,47.341 74.979,47.306 74.979,46.348 75.444,45.883 C83B.1@75.444,45.841 ; v1(74.8,71.171) 74.837,71.171 74.944,71.063 IC2A.18@74.944,69.841 74.979,69.806 74.979,68.848 75.444,68.383 C83A.1@75.444,68.341 ; v1(76.944,3.538) IC2D.22@76.944,2.341 76.994,2.291 76.994,1.091 C111D.1@77.244,0.841 ; v1(76.944,26.038) IC2C.22@76.944,24.841 76.994,24.791 76.994,23.591 C111C.1@77.244,23.341 ; v1(76.944,48.538) IC2B.22@76.944,47.341 76.994,47.291 76.994,46.091 C111B.1@77.244,45.841 ; v1(76.944,71.038) IC2A.22@76.944,69.841 76.994,69.791 76.994,68.591 C111A.1@77.244,68.341 ; C106D.1@77.244,19.388 77.769,19.388 78.444,18.713 IC2D.51@78.444,17.741 78.516,17.813 v1(78.894,17.813) ; C106C.1@77.244,41.888 77.769,41.888 78.444,41.213 IC2C.51@78.444,40.241 78.516,40.313 v1(78.894,40.313) ; C106B.1@77.244,64.388 77.769,64.388 78.444,63.713 IC2B.51@78.444,62.741 78.516,62.813 v1(78.894,62.813) ; C106A.1@77.244,86.888 77.769,86.888 78.444,86.213 IC2A.51@78.444,85.241 78.516,85.313 v1(78.894,85.313) ; v1(78.419,3.488) 78.419,2.366 IC2D.25@78.444,2.341 78.444,1.441 78.506,1.379 78.548,1.379 78.682,1.245 78.682,1.203 C82D.1@79.044,0.841 ; v1(78.419,25.988) 78.419,24.866 IC2C.25@78.444,24.841 78.444,23.941 78.506,23.879 78.548,23.879 78.682,23.745 78.682,23.703 C82C.1@79.044,23.341 ; v1(78.419,48.488) 78.419,47.366 IC2B.25@78.444,47.341 78.444,46.441 78.506,46.379 78.548,46.379 78.682,46.245 78.682,46.203 C82B.1@79.044,45.841 ; v1(78.419,70.988) 78.419,69.866 IC2A.25@78.444,69.841 78.444,68.941 78.506,68.879 78.548,68.879 78.682,68.745 78.682,68.703 C82A.1@79.044,68.341 ; v1(78.844,5.538) 78.847,5.541 IC2D.29@80.144,5.541 ; v1(78.844,28.038) 78.847,28.041 IC2C.29@80.144,28.041 ; v1(78.844,50.538) 78.847,50.541 IC2B.29@80.144,50.541 ; v1(78.844,73.038) 78.847,73.041 IC2A.29@80.144,73.041 ; v1(79.044,15.138) 79.141,15.041 IC2D.48@80.144,15.041 81.197,15.041 81.522,15.366 C52D.1@81.619,15.366 ; v1(79.044,37.638) 79.141,37.541 IC2C.48@80.144,37.541 81.197,37.541 81.522,37.866 C52C.1@81.619,37.866 ; v1(79.044,60.138) 79.141,60.041 IC2B.48@80.144,60.041 81.197,60.041 81.522,60.366 C52B.1@81.619,60.366 ; v1(79.044,82.638) 79.141,82.541 IC2A.48@80.144,82.541 81.197,82.541 81.522,82.866 C52A.1@81.619,82.866 ; v1(79.141,14.041) IC2D.46@80.144,14.041 ; v1(79.141,36.541) IC2C.46@80.144,36.541 ; v1(79.141,59.041) IC2B.46@80.144,59.041 ; v1(79.141,81.541) IC2A.46@80.144,81.541 ; 79.194,48.999 79.223,48.999 ; IC2D.26@80.144,4.041 78.97,4.041 78.97,4.293 v1(78.88,4.383) 79.038,4.541 IC2D.27@80.144,4.541 ; IC2D.31@80.144,6.541 81.141,6.541 81.334,6.733 81.334,6.791 ; IC2D.33@80.144,7.541 79.147,7.541 79.069,7.463 v1(79.069,7.063) 79.091,7.041 IC2D.32@80.144,7.041 81.094,7.041 81.091,7.038 81.334,6.796 81.334,6.791 ; IC2D.34@80.144,8.041 80.216,8.113 81.244,8.113 81.244,8.138 v1(81.394,8.288) 81.141,8.541 IC2D.35@80.144,8.541 ; IC2D.36@80.144,9.041 79.041,9.041 v1(78.819,9.263) 78.844,9.263 79.122,9.541 IC2D.37@80.144,9.541 ; IC2D.38@80.144,10.041 81.266,10.041 81.394,10.168 v1(81.394,10.288) 81.141,10.541 IC2D.39@80.144,10.541 ; IC2D.41@80.144,11.541 81.447,11.541 v1(81.544,11.638) 81.544,12.056 81.619,12.131 ; IC2D.42@80.144,12.041 81.447,12.041 81.537,12.131 81.619,12.131 ; IC2D.43@80.144,12.541 81.519,12.541 C105D.1@81.619,12.641 ; IC2D.44@80.144,13.041 81.094,13.041 81.094,13.088 81.541,12.641 C105D.1@81.619,12.641 ; IC2D.49@80.144,15.541 81.444,15.541 C52D.1@81.619,15.366 ; IC2D.50@80.144,16.041 81.447,16.041 81.612,15.876 81.619,15.876 C52D.1@81.619,15.366 ; IC2C.26@80.144,26.541 79.111,26.541 v1(78.931,26.721) 78.931,26.783 79.194,27.046 79.194,27.041 IC2C.27@80.144,27.041 ; IC2C.31@80.144,29.041 81.141,29.041 81.334,29.233 81.334,29.291 ; IC2C.33@80.144,30.041 79.147,30.041 79.069,29.963 v1(79.069,29.563) 79.091,29.541 IC2C.32@80.144,29.541 81.094,29.541 81.091,29.538 81.334,29.296 81.334,29.291 ; IC2C.34@80.144,30.541 80.216,30.613 81.244,30.613 81.244,30.638 v1(81.394,30.788) 81.141,31.041 IC2C.35@80.144,31.041 ; IC2C.36@80.144,31.541 79.041,31.541 v1(78.819,31.763) 78.844,31.763 79.122,32.041 IC2C.37@80.144,32.041 ; IC2C.38@80.144,32.541 81.266,32.541 81.394,32.668 v1(81.394,32.788) 81.141,33.041 IC2C.39@80.144,33.041 ; IC2C.41@80.144,34.041 81.447,34.041 v1(81.544,34.138) 81.544,34.556 81.619,34.631 ; IC2C.42@80.144,34.541 81.447,34.541 81.537,34.631 81.619,34.631 ; IC2C.43@80.144,35.041 81.519,35.041 C105C.1@81.619,35.141 ; IC2C.44@80.144,35.541 81.094,35.541 81.094,35.588 81.541,35.141 C105C.1@81.619,35.141 ; IC2C.49@80.144,38.041 81.444,38.041 C52C.1@81.619,37.866 ; IC2C.50@80.144,38.541 81.447,38.541 81.612,38.376 81.619,38.376 C52C.1@81.619,37.866 ; IC2B.26@80.144,49.041 80.102,48.999 79.223,48.999 ; IC2B.27@80.144,49.541 80.102,49.499 79.044,49.499 79.044,48.82 79.223,48.999 ; IC2B.31@80.144,51.541 81.141,51.541 81.334,51.733 81.334,51.791 ; IC2B.33@80.144,52.541 79.147,52.541 79.069,52.463 v1(79.069,52.063) 79.091,52.041 IC2B.32@80.144,52.041 81.094,52.041 81.091,52.038 81.334,51.796 81.334,51.791 ; IC2B.34@80.144,53.041 80.216,53.113 81.244,53.113 81.244,53.138 v1(81.394,53.288) 81.141,53.541 IC2B.35@80.144,53.541 ; IC2B.36@80.144,54.041 79.041,54.041 v1(78.819,54.263) 78.844,54.263 79.122,54.541 IC2B.37@80.144,54.541 ; IC2B.38@80.144,55.041 81.266,55.041 81.394,55.168 v1(81.394,55.288) 81.141,55.541 IC2B.39@80.144,55.541 ; IC2B.41@80.144,56.541 81.447,56.541 v1(81.544,56.638) 81.544,57.056 81.619,57.131 ; IC2B.42@80.144,57.041 81.447,57.041 81.537,57.131 81.619,57.131 ; IC2B.43@80.144,57.541 81.519,57.541 C105B.1@81.619,57.641 ; IC2B.44@80.144,58.041 81.094,58.041 81.094,58.088 81.541,57.641 C105B.1@81.619,57.641 ; IC2B.49@80.144,60.541 81.444,60.541 C52B.1@81.619,60.366 ; IC2B.50@80.144,61.041 81.447,61.041 81.612,60.876 81.619,60.876 C52B.1@81.619,60.366 ; IC2A.26@80.144,71.541 79.134,71.541 v1(78.956,71.718) 79.044,71.806 79.044,72.041 IC2A.27@80.144,72.041 ; IC2A.31@80.144,74.041 81.141,74.041 81.334,74.233 81.334,74.291 ; IC2A.33@80.144,75.041 79.147,75.041 79.069,74.963 v1(79.069,74.563) 79.091,74.541 IC2A.32@80.144,74.541 81.094,74.541 81.091,74.538 81.334,74.296 81.334,74.291 ; IC2A.34@80.144,75.541 80.216,75.613 81.244,75.613 81.244,75.638 v1(81.394,75.788) 81.141,76.041 IC2A.35@80.144,76.041 ; IC2A.36@80.144,76.541 79.041,76.541 v1(78.819,76.763) 78.844,76.763 79.122,77.041 IC2A.37@80.144,77.041 ; IC2A.38@80.144,77.541 81.266,77.541 81.394,77.668 v1(81.394,77.788) 81.141,78.041 IC2A.39@80.144,78.041 ; IC2A.41@80.144,79.041 81.447,79.041 v1(81.544,79.138) 81.544,79.556 81.619,79.631 ; IC2A.42@80.144,79.541 81.447,79.541 81.537,79.631 81.619,79.631 ; IC2A.43@80.144,80.041 81.519,80.041 C105A.1@81.619,80.141 ; IC2A.44@80.144,80.541 81.212,80.541 81.225,80.528 81.232,80.528 C105A.1@81.619,80.141 ; IC2A.49@80.144,83.041 81.444,83.041 C52A.1@81.619,82.866 ; IC2A.50@80.144,83.541 81.447,83.541 81.612,83.376 81.619,83.376 C52A.1@81.619,82.866 ; v1(81.122,40.438) C84C.2@82.714,40.438 82.714,41.93 v1(82.731,41.947) ; v1(81.144,85.547) 81.253,85.438 C84A.2@82.714,85.438 82.714,86.83 v1(82.731,86.847) ; v1(81.264,17.947) 82.705,17.947 C84D.2@82.714,17.938 82.714,19.43 v1(82.731,19.447) ; v1(81.264,62.847) 82.623,62.847 C84B.2@82.714,62.938 82.714,64.264 v1(82.631,64.347) ; v1(82.294,15.388) 82.272,15.366 C52D.1@81.619,15.366 ; v1(82.294,37.888) 82.272,37.866 C52C.1@81.619,37.866 ; v1(82.294,60.388) 82.272,60.366 C52B.1@81.619,60.366 ; v1(82.294,82.888) 82.272,82.866 C52A.1@81.619,82.866 ; v1(82.499,6.764) 81.871,6.764 C53D.1@81.844,6.791 81.334,6.791 ; v1(82.499,29.264) 81.871,29.264 C53C.1@81.844,29.291 81.334,29.291 ; v1(82.499,51.764) 81.871,51.764 C53B.1@81.844,51.791 81.334,51.791 ; v1(82.499,74.264) 81.871,74.264 C53A.1@81.844,74.291 81.334,74.291 ; C85D.1@82.771,4.605 82.766,4.61 82.766,5.115 82.792,5.141 v1(82.792,5.221) ; C85C.1@82.771,27.105 83.046,27.38 v1(83.046,27.725) ; C85B.1@82.771,49.605 82.771,49.614 v1(83.223,50.065) ; C85A.1@82.771,72.105 82.771,72.764 82.801,72.734 v1(82.817,72.734) ; v1@82.877,27.624 v1@82.979,27.725 ; v1(83.794,11.763) 83.819,11.738 C151D.1@84.484,11.738 ; v1(83.794,34.263) 83.819,34.238 C151C.1@84.484,34.238 ; v1(83.794,56.763) 83.819,56.738 C151B.1@84.484,56.738 ; v1(83.794,79.263) 83.819,79.238 C151A.1@84.484,79.238 ; v1(83.819,10.763) 83.844,10.738 C154D.1@84.484,10.738 84.531,10.691 84.531,10.287 84.928,10.287 84.99,10.225 85.237,10.225 85.262,10.2 85.788,10.2 85.879,10.291 IC13D.8@86.634,10.291 86.637,10.288 v1(87.319,10.288) ; v1(83.819,33.263) 83.844,33.238 C154C.1@84.484,33.238 84.531,33.191 84.531,32.772 84.943,32.772 84.99,32.725 85.318,32.725 85.343,32.7 85.788,32.7 85.879,32.791 IC13C.8@86.634,32.791 86.637,32.788 v1(87.319,32.788) ; v1(83.819,55.763) 83.844,55.738 C154B.1@84.484,55.738 84.531,55.691 84.531,55.272 84.943,55.272 84.99,55.225 85.074,55.225 85.099,55.2 85.788,55.2 85.879,55.291 IC13B.8@86.634,55.291 86.637,55.288 v1(87.319,55.288) ; v1(83.819,78.263) 83.844,78.238 C154A.1@84.484,78.238 84.531,78.191 84.531,77.8 84.915,77.8 84.99,77.725 85.403,77.725 85.428,77.7 85.788,77.7 85.879,77.791 IC13A.8@86.634,77.791 86.637,77.788 v1(87.319,77.788) ; v1(83.87,7.78) 84.436,7.78 C136D.1@84.563,7.907 84.563,7.069 C142D.1@84.538,7.044 ; v1(83.87,30.28) 84.436,30.28 C136C.1@84.563,30.407 84.563,29.569 C142C.1@84.538,29.544 ; v1(83.87,52.78) 84.436,52.78 C136B.1@84.563,52.907 84.563,52.069 C142B.1@84.538,52.044 ; v1(83.87,75.28) 84.436,75.28 C136A.1@84.563,75.407 84.563,74.569 C142A.1@84.538,74.544 ; v1(83.959,14.523) 83.994,14.523 84.034,14.563 C137D.1@84.544,14.563 ; v1(83.959,37.023) 83.994,37.023 84.034,37.063 C137C.1@84.544,37.063 ; v1(83.959,59.523) 83.994,59.523 84.034,59.563 C137B.1@84.544,59.563 ; v1(83.959,82.023) 83.994,82.023 84.034,82.063 C137A.1@84.544,82.063 ; C153D.1@84.484,12.738 84.619,12.873 84.619,13.263 84.647,13.291 IC13D.2@86.634,13.291 86.637,13.288 v1(87.294,13.288) ; C153C.1@84.484,35.238 84.619,35.373 84.619,35.763 84.647,35.791 IC13C.2@86.634,35.791 86.637,35.788 v1(87.294,35.788) ; C153B.1@84.484,57.738 84.619,57.873 84.619,58.263 84.647,58.291 IC13B.2@86.634,58.291 86.637,58.288 v1(87.294,58.288) ; C153A.1@84.484,80.238 84.619,80.373 84.619,80.763 84.647,80.791 IC13A.2@86.634,80.791 86.637,80.788 v1(87.294,80.788) ; C140D.1@84.584,8.838 84.584,9.428 v1(84.594,9.438) ; C140C.1@84.584,31.338 84.584,31.928 v1(84.594,31.938) ; C140B.1@84.584,53.838 84.584,54.428 v1(84.594,54.438) ; C140A.1@84.584,76.338 84.584,76.928 v1(84.594,76.938) ; v1(85.798,27.015) 85.813,27.029 C135C.1@86.494,27.029 ; v1(85.801,4.58) 85.852,4.529 C135D.1@86.494,4.529 ; v1(85.801,72.08) 85.852,72.029 C135A.1@86.494,72.029 ; v1(85.906,49.347) 85.906,49.475 85.852,49.529 C135B.1@86.494,49.529 ; v1(85.979,2.141) C114D.2@87.489,2.141 87.489,3.499 v1(87.553,3.564) ; v1(85.979,24.641) C114C.2@87.489,24.641 87.489,25.999 v1(87.553,26.064) ; v1(85.979,47.141) C114B.2@87.489,47.141 87.489,48.499 v1(87.553,48.564) ; v1(86.059,69.533) 87.38,69.533 C114A.2@87.489,69.641 87.489,70.999 v1(87.553,71.064) ; IC13D.6@86.634,11.291 86.581,11.238 v1(87.394,11.238) ; IC13D.4@86.634,12.291 87.316,12.291 v1(87.319,12.288) ; IC13C.6@86.634,33.791 86.581,33.738 v1(87.394,33.738) ; IC13C.4@86.634,34.791 87.316,34.791 v1(87.319,34.788) ; IC13B.6@86.634,56.291 86.581,56.238 v1(87.394,56.238) ; IC13B.4@86.634,57.291 87.316,57.291 v1(87.319,57.288) ; IC13A.6@86.634,78.791 86.581,78.738 v1(87.394,78.738) ; IC13A.4@86.634,79.791 87.316,79.791 v1(87.319,79.788) ; C114D.2@88.319,2.813 C114D.2@88.334,2.828 ; C114C.2@88.319,25.313 C114C.2@88.334,25.328 ; C114B.2@88.319,47.813 C114B.2@88.334,47.828 ; C114A.2@88.319,70.313 C114A.2@88.334,70.328 ; C138D.1@89.594,3.488 89.644,3.438 v1(89.644,2.788) ; C138C.1@89.594,25.988 89.644,25.938 v1(89.644,25.288) ; C138B.1@89.594,48.488 89.644,48.438 v1(89.644,47.788) ; C138A.1@89.594,70.988 89.644,70.938 v1(89.644,70.338) ; 89.627,-1.366 v1(89.627,-0.274) ; IC13D.58@90.334,14.491 90.334,13.773 90.469,13.638 v1(90.844,13.638) ; IC13C.58@90.334,36.991 90.334,36.273 90.469,36.138 v1(90.844,36.138) ; IC13B.58@90.334,59.491 90.334,58.773 90.469,58.638 v1(90.844,58.638) ; IC13A.58@90.334,81.991 90.334,81.273 90.481,81.127 v1@90.856,81.127 ; IC13D.57@90.834,14.491 90.834,13.648 v1(90.844,13.638) ; IC13C.57@90.834,36.991 90.834,36.148 v1(90.844,36.138) ; IC13B.57@90.834,59.491 90.834,58.648 v1(90.844,58.638) ; IC13A.57@90.834,81.991 90.834,81.148 v1@90.856,81.127 ; v1(90.944,2.788) 90.984,2.828 C134D.1@90.984,3.438 C127D.1@91.884,3.438 ; v1(90.944,25.288) 90.984,25.328 C134C.1@90.984,25.938 C127C.1@91.884,25.938 ; v1(90.944,47.788) 90.984,47.828 C134B.1@90.984,48.438 C127B.1@91.884,48.438 ; v1(90.944,70.491) 90.944,70.898 C134A.1@90.984,70.938 C127A.1@91.884,70.938 ; v1(91.222,62.249) 91.254,62.249 91.334,62.329 C149B.1@91.334,61.588 92.202,61.588 C150B.1@92.235,61.62 ; v1(91.223,88.749) 91.362,88.888 CLIP6.1@96.544,88.888 96.683,88.749 v1(101.723,88.749) ; v1(91.331,39.747) 91.331,39.091 C149C.1@91.334,39.088 ; IC13D.56@91.334,14.491 91.334,13.753 91.219,13.638 v1(90.844,13.638) ; C149D.1@91.334,16.588 92.202,16.588 C150D.1@92.235,16.62 92.223,16.632 92.223,17.13 92.341,17.249 v1(92.472,17.249) ; IC13C.56@91.334,36.991 91.334,36.253 91.219,36.138 v1(90.844,36.138) ; IC13B.56@91.334,59.491 91.334,58.753 91.219,58.638 v1(90.844,58.638) ; IC13A.56@91.334,81.991 91.334,81.253 91.207,81.127 v1(90.982,81.127) v1@90.856,81.127 ; C149A.1@91.334,84.088 92.202,84.088 C150A.1@92.235,84.12 92.235,84.64 v1(92.278,84.684) ; v1(91.723,43.749) 96.904,43.749 CLIP13.1@97.044,43.888 97.473,43.46 v1(97.473,42.249) ; v1(91.723,66.249) 96.904,66.249 CLIP12.1@97.044,66.388 102.083,66.388 v1(102.248,66.223) ; C150C.1@92.235,39.12 92.235,39.843 92.238,39.847 v1(92.331,39.847) ; v1(93.236,84.847) 93.236,84.827 93.284,84.778 C126A.1@93.284,84.141 93.334,84.091 IC13A.52@93.334,81.991 ; v1(93.319,39.813) 93.284,39.778 C126C.1@93.284,39.141 93.334,39.091 IC13C.52@93.334,36.991 ; v1(93.319,62.313) 93.284,62.278 C126B.1@93.284,61.641 93.334,61.591 IC13B.52@93.334,59.491 ; IC13D.52@93.334,14.491 93.334,16.591 C126D.1@93.284,16.641 93.284,17.278 93.359,17.353 v1(93.893,17.353) ; v1(93.437,19.766) 93.437,20.554 93.895,21.011 96.667,21.011 CLIP4.1@97.044,21.388 ; C133D.1@93.694,3.513 94.145,3.062 94.145,3.04 v1(94.069,2.963) ; C133C.1@93.694,26.013 94.145,25.562 94.145,25.54 v1(94.069,25.463) ; C133B.1@93.694,48.513 94.145,48.062 94.145,48.04 v1(94.069,47.963) ; C133A.1@93.694,71.013 94.002,70.705 94.002,70.558 v1(94.069,70.491) ; v1(94.726,6.496) 94.726,6.461 94.897,6.291 IC13D.33@95.534,6.291 ; v1(94.726,28.996) 94.726,28.961 94.897,28.791 IC13C.33@95.534,28.791 ; v1(94.726,51.496) 94.726,51.461 94.897,51.291 IC13B.33@95.534,51.291 ; v1(94.726,73.996) 94.838,73.996 95.043,73.791 IC13A.33@95.534,73.791 ; v1(94.794,9.263) 95.506,9.263 IC13D.39@95.534,9.291 ; v1(94.794,31.763) 95.506,31.763 IC13C.39@95.534,31.791 ; v1(94.794,54.263) 95.506,54.263 IC13B.39@95.534,54.291 ; v1(94.794,76.763) 95.506,76.763 IC13A.39@95.534,76.791 ; v1(94.844,11.288) 95.531,11.288 IC13D.43@95.534,11.291 ; v1(94.844,33.788) 95.531,33.788 IC13C.43@95.534,33.791 ; v1(94.844,56.288) 95.531,56.288 IC13B.43@95.534,56.291 ; v1(94.844,78.788) 95.531,78.788 IC13A.43@95.534,78.791 ; C128D.1@95.519,4.413 95.544,4.438 C128D.1@95.594,4.438 ; C128C.1@95.519,26.913 95.544,26.938 C128C.1@95.594,26.938 ; C128B.1@95.519,49.413 95.544,49.438 C128B.1@95.594,49.438 ; C128A.1@95.519,71.913 95.544,71.938 C128A.1@95.594,71.938 ; C128D.1@95.594,4.213 C128D.1@95.594,4.438 ; C128C.1@95.594,26.713 C128C.1@95.594,26.938 ; C128B.1@95.594,49.213 C128B.1@95.594,49.438 ; C128A.1@95.594,71.713 C128A.1@95.594,71.938 ; v1(96.026,4.745) 95.719,4.438 C128D.1@95.594,4.438 ; v1(96.026,27.245) 95.719,26.938 C128C.1@95.594,26.938 ; v1(96.026,49.745) 95.719,49.438 C128B.1@95.594,49.438 ; v1(96.026,72.245) 95.719,71.938 C128A.1@95.594,71.938 ; v1(96.777,22.788) 96.777,21.764 96.723,21.71 CLIP4.1@97.044,21.388 ; CLIP9.1@97.044,-1.112 106.744,-1.112 C156.2@107.294,-0.562 ; C147D.1@97.619,7.438 97.619,8.363 C141D.1@97.644,8.388 98.219,8.388 v1(98.244,8.413) ; C147C.1@97.619,29.938 97.619,30.863 C141C.1@97.644,30.888 98.219,30.888 v1(98.244,30.913) ; C147B.1@97.619,52.438 97.619,53.363 C141B.1@97.644,53.388 98.219,53.388 v1(98.244,53.413) ; C147A.1@97.619,74.938 97.619,75.863 97.832,76.076 v1(98.244,76.076) ; R89D.2@97.664,5.288 97.743,5.367 v1(98.221,5.367) ; R89C.2@97.664,27.788 97.997,28.121 v1(98.831,28.121) 99.297,28.121 C115C.2@100.264,29.088 ; R89B.2@97.664,50.288 97.743,50.367 v1(98.221,50.367) ; R89A.2@97.664,72.788 97.743,72.867 v1(98.221,72.867) ; C130D.1@97.684,12.938 98.319,12.938 v1(98.344,12.913) ; C125D.1@97.684,13.838 97.684,14.362 v1(97.752,14.43) v1@97.886,14.43 ; C130C.1@97.684,35.438 98.319,35.438 v1(98.344,35.413) ; C125C.1@97.684,36.338 97.684,36.862 v1(97.752,36.93) v1@97.886,36.93 ; C130B.1@97.684,57.938 98.319,57.938 98.348,57.968 v1(98.348,57.987) ; C125B.1@97.684,58.838 97.684,59.406 v1(97.764,59.486) 97.83,59.486 v1@97.886,59.43 ; C130A.1@97.684,80.438 98.319,80.438 98.416,80.341 v1(98.47,80.341) ; C125A.1@97.684,81.338 97.684,81.862 v1(97.752,81.93) v1@97.886,81.93 ; v1(98.294,9.338) 97.614,9.338 97.614,11.968 C144D.1@97.684,12.038 v1(98.344,12.038) ; v1(98.294,31.838) 97.614,31.838 97.614,34.468 C144C.1@97.684,34.538 v1(98.344,34.538) ; v1(98.294,54.338) 97.614,54.338 97.614,56.968 C144B.1@97.684,57.038 v1(98.344,57.038) ; v1(98.294,76.838) 97.614,76.838 97.614,79.468 97.684,79.538 98.385,79.538 v1(98.4,79.553) ; v1(98.831,5.621) 99.297,5.621 C115D.2@100.264,6.588 ; v1(98.831,50.621) 99.297,50.621 C115B.2@100.264,51.588 ; v1(98.831,73.121) 99.297,73.121 C115A.2@100.313,74.137 ; C162A.2@100.194,77.091 100.542,75.992 100.542,75.637 100.583,75.574 v1(100.61,75.547) 100.61,74.434 C115A.2@100.313,74.137 ; v1@100.203,56.162 v1@100.253,56.112 ; v1@100.253,11.112 100.264,11.101 v1(100.264,11.03) C162D.2@100.264,9.588 ; v1(100.254,56.007) 100.254,56.061 100.228,56.086 v1@100.254,56.111 ; v1(100.254,78.511) 100.254,78.612 100.264,78.622 100.264,77.088 101.589,77.088 101.676,77.001 101.676,76.728 v1(101.733,76.671) ; v1(101.701,9.203) 101.676,9.228 101.676,9.501 101.589,9.588 C162D.2@100.264,9.588 ; v1(101.701,31.703) 101.676,31.728 101.676,32.001 101.589,32.088 C162C.2@100.264,32.088 ; v1(101.701,54.203) 101.676,54.228 101.676,54.501 101.589,54.588 C162B.2@100.264,54.588 ; v1(101.803,6.637) 100.313,6.637 C115D.2@100.264,6.588 ; v1(101.803,29.137) 100.313,29.137 C115C.2@100.264,29.088 ; v1(101.803,51.637) 100.313,51.637 C115B.2@100.264,51.588 ; v1(101.9,74.137) C115A.2@100.313,74.137 ; v1(102.044,32.749) 102.904,32.749 CLIP28.1@103.544,33.388 ; v1(102.223,21.749) 102.223,21.617 101.994,21.388 CLIP4.1@97.044,21.388 ; v1(103.473,4.999) 103.544,5.07 CLIP27.1@103.544,10.388 ; v1(103.473,60.249) 103.473,54.96 CLIP29.1@103.544,54.888 103.544,49.82 103.473,49.749 103.556,49.666 v1(103.556,49.632) ; v1(103.473,82.499) 103.473,77.46 CLIP1.1@103.544,77.388 103.544,74.503 103.615,74.433 103.568,74.386 v1(103.568,72.249) ; v1(104.044,87.638) C169.1@105.294,87.638 v1(106.294,87.638) ; v1(104.723,0.249) 105.533,-0.562 C156.2@107.294,-0.562 ; v1@105.374,-0.402 v1(105.477,-0.299) ; v1(105.894,4.249) 107.305,4.249 107.494,4.438 109.572,4.438 v1(109.633,4.499) ; v1@106.038,57.493 106.035,57.49 106.031,57.493 C76.2@107.367,57.493 107.367,56.059 v1(107.301,55.993) ; C167.2@106.412,78.207 C167.2@106.594,78.388 ; v1(106.544,79.138) 106.594,79.088 C167.2@106.594,78.388 ; v1(106.594,77.602) C167.2@106.594,78.388 ; v1(106.944,43.688) 106.969,43.713 IC19.6@107.744,43.713 ; v1(106.972,8.249) R80.1@106.972,9.115 ; v1(107.277,47.563) 107.277,47.754 C98.1@107.611,48.087 ; v1(107.277,63.888) 107.389,63.777 C163.1@107.389,61.975 107.389,60.303 v1(107.399,60.293) v1@107.409,60.283 ; C98.1@107.455,48.049 C98.1@107.594,48.188 ; C91.1@107.703,38.277 107.694,38.286 C97.1@107.694,39.188 107.694,40.358 v1(107.873,40.537) ; v1(108.479,26.594) 109.069,26.003 LD4.1@109.069,25.988 109.67,25.387 v1(111.54,25.387) ; v1(109.017,0.584) 109.079,0.522 109.079,0.061 109.168,-0.029 110.055,-0.029 110.144,-0.118 C183.1@110.144,-1.112 107.844,-1.112 C156.2@107.294,-0.562 ; v1(110.269,28.032) 110.942,28.032 C123.1@110.965,28.009 ; v1(110.585,47.965) 111.05,47.965 111.244,47.771 IC19.39@111.244,47.213 ; v1(110.747,38.78) 110.747,38.553 111.032,38.268 111.414,38.268 C94.1@111.444,38.238 ; IC18.21@110.916,81.53 110.916,81.988 IC18.12@111.644,81.988 113.694,81.988 v1(113.794,81.888) ; IC24.1@111.293,31.196 111.293,31.946 v2(112.043,32.696) ; IC24.17@111.452,33.287 v2(112.043,32.696) ; R130.1@111.844,86.638 v1(112.694,86.638) ; v1(111.973,12.749) 112.033,12.688 C77.1@112.794,12.688 113.081,12.401 IC7.12@113.081,11.397 ; v1(112.223,4.999) C63.2@112.773,4.999 ; v2(112.639,32.1) v2(112.043,32.696) ; v2(112.652,33.306) v2(112.043,32.696) ; IC19.22@113.744,40.213 IC19.22@113.78,40.177 ; IC19.22@113.794,40.163 IC19.22@113.78,40.177 ; v1(113.948,29.84) 113.968,29.84 C131.1@114.456,30.327 ; v1(114.125,40.177) IC19.22@113.78,40.177 ; v1(114.565,39.291) 114.864,38.991 R108.2@114.864,38.363 ; v1(114.737,35.541) 114.737,34.544 R110.2@114.864,34.671 ; v1(115.065,4.999) 115.065,5.442 115.293,5.442 C211.1@115.704,5.853 115.945,5.612 v1(116.859,5.612) ; C100.1@115.194,48.188 v1(115.869,48.188) 115.963,48.188 116.052,48.277 116.291,48.277 R141.1@116.665,48.651 R141.1@116.665,48.601 ; C122.2@115.776,33.713 115.911,33.848 v1(116.513,33.848) ; v1(117.438,5.784) 117.472,5.749 117.744,5.749 119.155,5.749 C166.1@119.294,5.888 v1(119.294,4.938) v1@119.294,4.82 ; v1(117.544,11.888) 117.594,11.838 R119.1@118.494,11.838 ; v1(120.396,17.78) 120.821,17.78 LD3.1@121.124,17.478 ; v2(124.181,10.88) v2(124.781,11.48) 124.884,11.583 C165.1@124.884,14.541 ; C45.1@124.598,51.135 v1@125.41,51.135 ; v1(124.629,3.017) 124.629,2.737 124.786,2.58 124.786,2.359 124.854,2.291 IC22.3@125.944,2.291 ; IC16.4@125.348,49.235 125.348,51.072 v1@125.41,51.135 ; v1(125.508,51.232) v1@125.41,51.135 ; v1(125.752,43.693) 125.981,43.922 126.535,43.922 C46.1@126.598,43.985 ; IC16.2@126.348,49.235 126.348,50.185 v1(126.598,50.435) ; v1(126.445,75.353) v1@126.451,75.353 ; IC22.11@126.694,0.341 v1(127.181,0.341) ; IC22.4@126.694,3.241 126.694,3.381 126.762,3.45 126.734,3.478 126.734,3.573 126.959,3.798 v1(127.074,3.684) ; C182.1@126.758,-1.562 C182.1@126.823,-1.497 ; IC10.F6@126.964,74.841 IC10.F6@126.97,74.841 ; IC10.L6@126.97,69.841 126.973,69.841 127.495,69.319 v1(127.498,69.319) ; v1@127.134,0.109 127.134,-1.185 C182.1@126.823,-1.497 ; IC22.3@127.134,2.376 IC22.3@127.167,2.409 ; v1(127.284,2.664) 127.284,2.526 IC22.3@127.167,2.409 ; v1(127.473,3.233) 127.473,3.093 C181.1@127.943,2.623 ; v1(127.6,-1.497) C182.1@126.823,-1.497 ; C181.1@127.944,2.541 127.792,2.389 127.542,2.389 127.562,2.409 IC22.3@127.167,2.409 ; C74.2@129.197,-2.077 129.367,-1.907 129.707,-1.907 129.877,-1.738 129.889,-1.738 C74.2@130.235,-1.392 ; v1@131.444,84.188 v1(131.444,84.388) ; IC10.F11@131.97,74.841 IC10.F11@132.038,74.841